# Altium PCB Telephone Circuit v1.0.PcbDoc (part 5 of 5)
Units mil, origin at the board's own origin, x right, y up, seen from the top; angles counter-clockwise.
Board outline 3149.61 x 2952.76 mil, 2 copper layers (Top Layer, Bottom Layer), stack 61.855 mil thick; 194 components, 119 nets, 557 pads, 213 vias.
Unrouted connection lines stored in the file: 77.
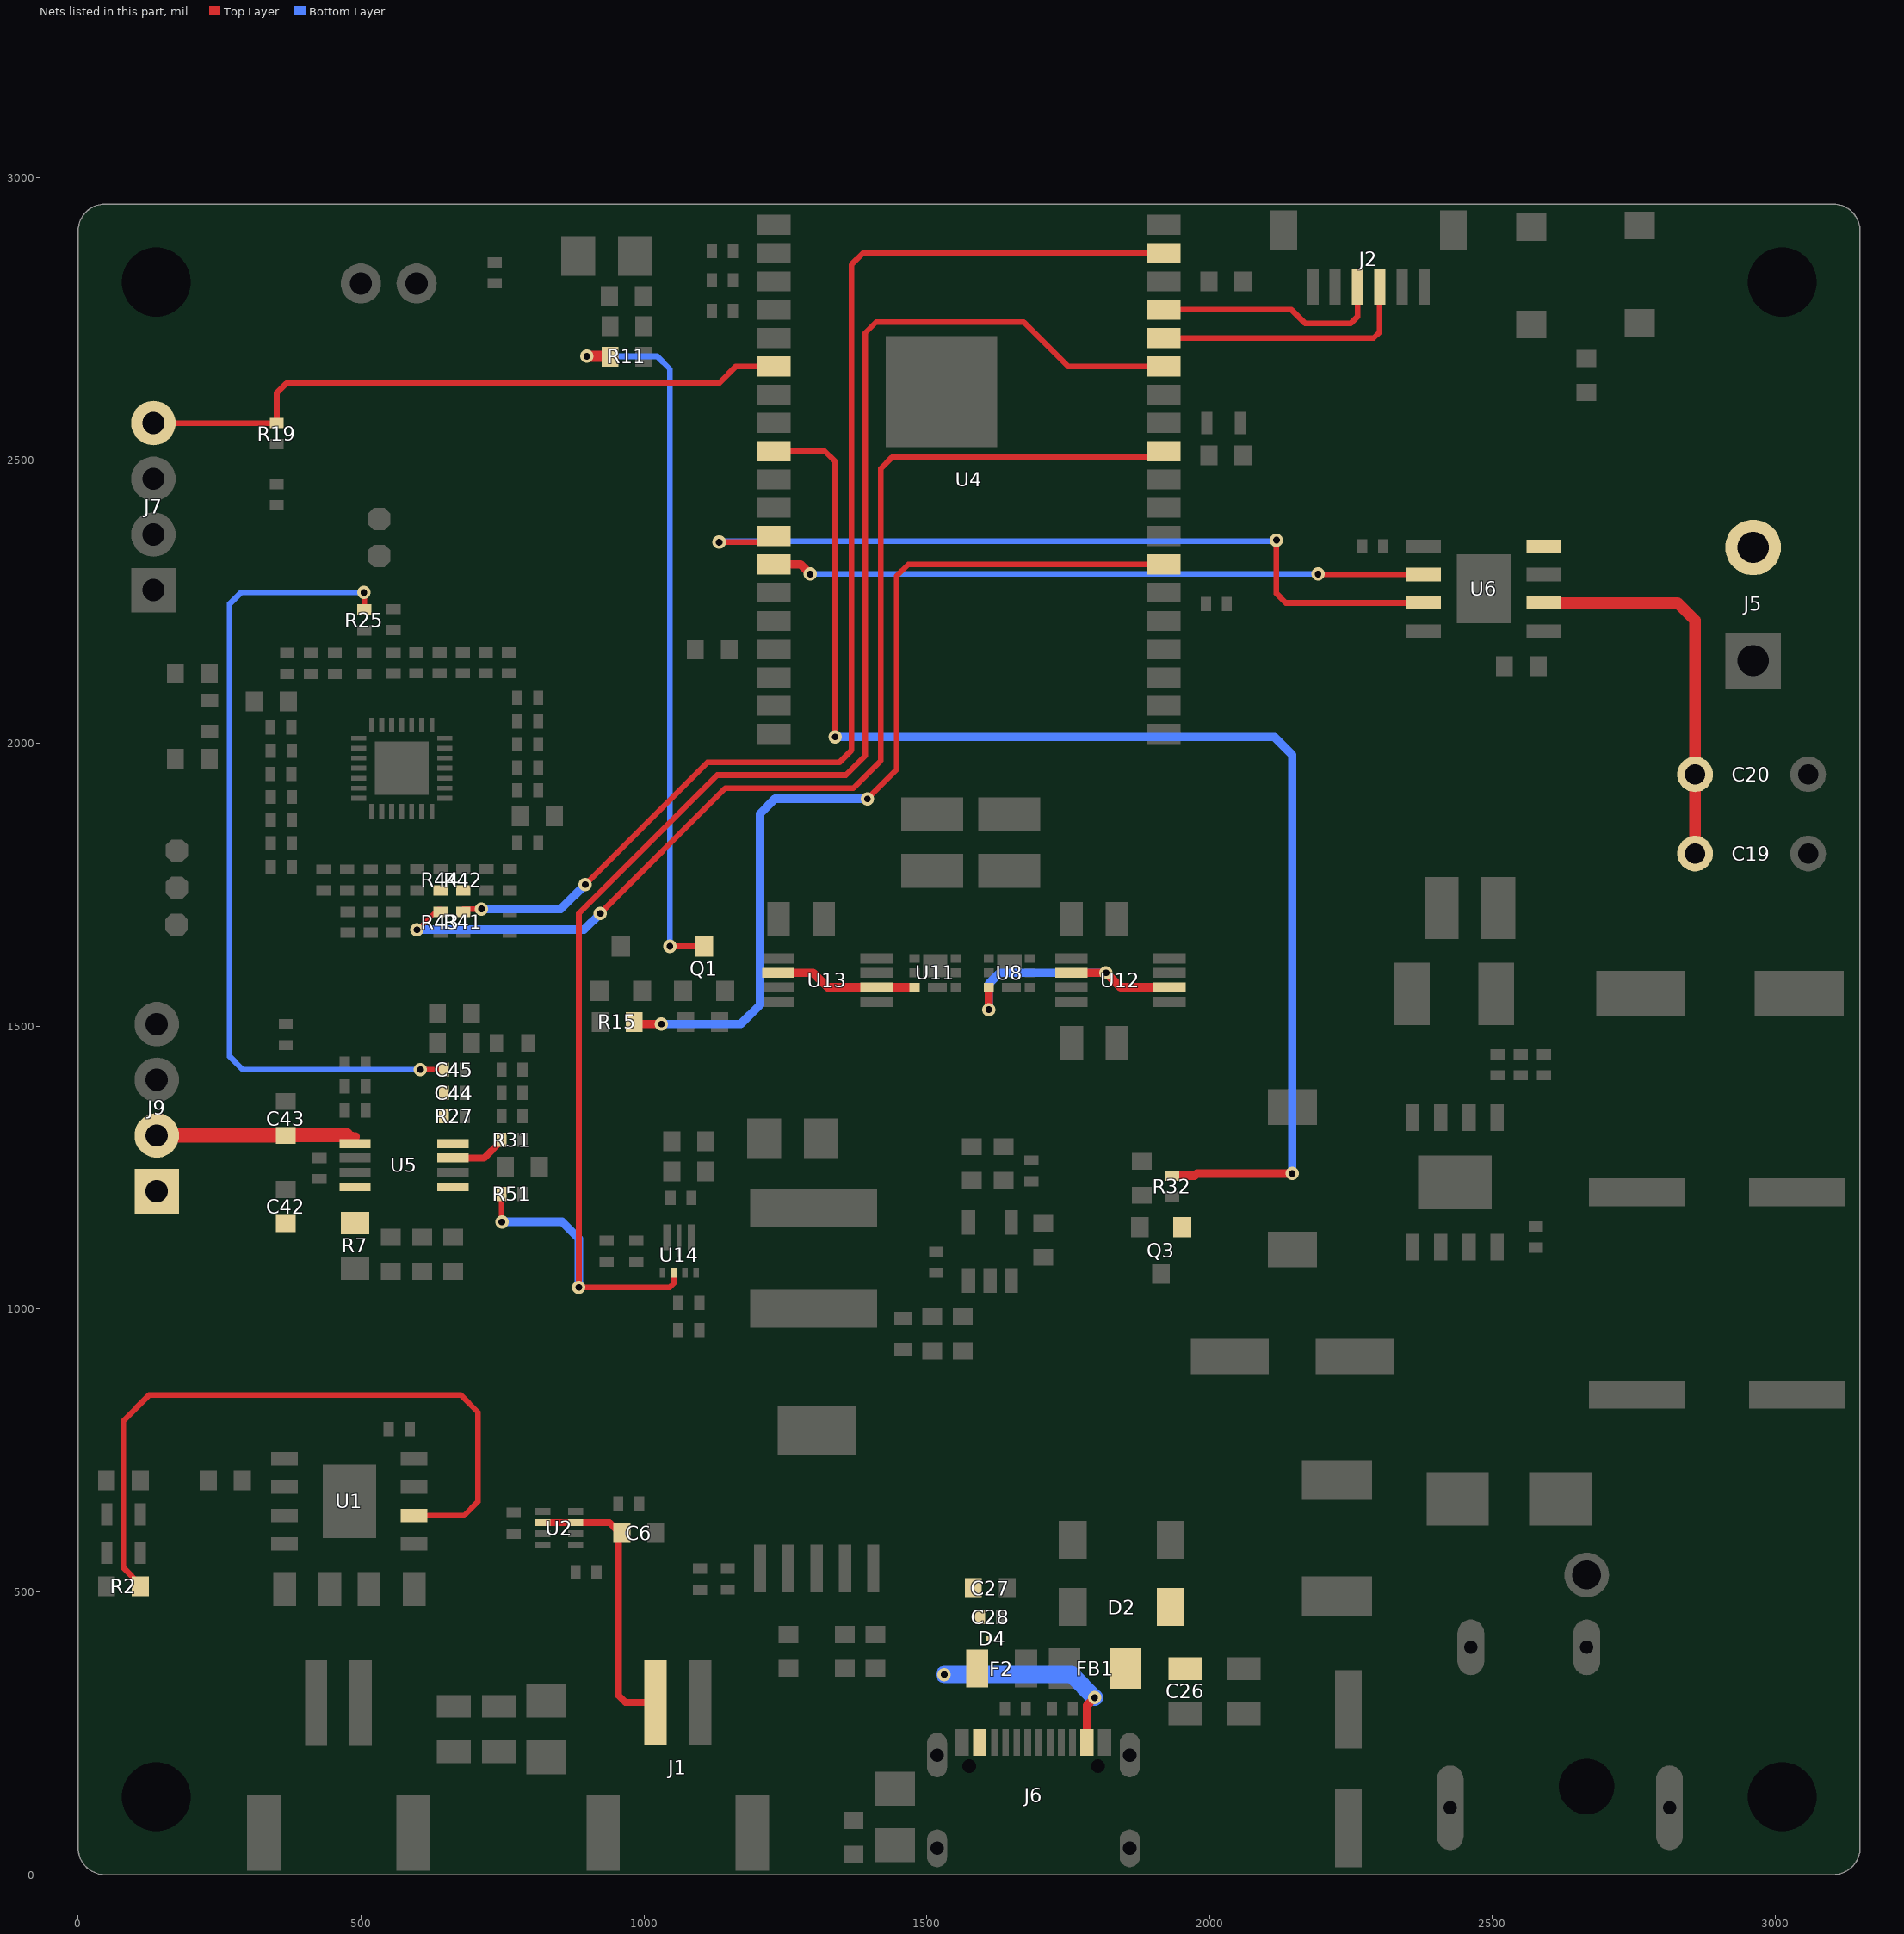
[diagram p3: the nets of this part, all layers, seen from the top]

## Via types
v1: diameter 23.62, hole 11.81, Top Layer to Bottom Layer, tented both sides, 213 vias

## Nets (pads, with @x,y where several pads share a name; then routed paths per layer and width w, separated by ;. In a path a pad name is that pad's centre, name@x,y a point inside that pad or via, vN(x,y) a via of type N, cw(c..) or ccw(c..) an arc to the next point about the centre after c; other vN are vias at no path point) (continued)
NetU8_3: U8.3 U12.2 U12.6 | length 484.1
  Top Layer w15: v1(1609.68,1528.96) U8.3@1609.68,1568.41 ; U12.2@1755.77,1594.06 v1(1816.8,1594.06) 1842.39,1568.47 U12.6@1929,1568.47
  Bottom Layer w15: v1(1609.68,1528.96) 1609.68,1574.65 1629.09,1594.06 v1(1816.8,1594.06)
NetU11_3: U11.3 U13.2 U13.6 | length 251.2
  Top Layer w15: U13.2@1237.98,1594.06 1299,1594.06 1324.59,1568.47 U13.6@1411.2,1568.47 U11.3@1478.59,1568.47
PA_CTRL_IO21: R51.2 U4.33 U5.1 U14.5 | length 3071.5
  Top Layer w10: R51.2@748.49,1203.26 748.49,1153.8 v1(749.01,1153.8) ; U14.5@1052.63,1063.71 1052.63,1045.03 1045.57,1037.98 885.18,1037.98 v1(884.96,1038.19) v1(884.96,1038.19) 885.02,1699.05 1129.61,1943.64 1356.92,1943.64 1391.34,1978.05 1391.34,2725.29 1410.35,2744.3 1671.45,2744.3 1749.61,2666.15 U4.33@1919,2666.15
  Bottom Layer w15: v1(749.01,1153.8) 855.46,1153.8 884.96,1124.29 v1(884.96,1038.19)
PA_INR+: R31.1 U5.3 | length 102.1
  Top Layer w12: U5.3@662.61,1266.8 717.8,1266.8 745.5,1294.5 748.5,1297.5 R31.1@748.5,1301
PA_INR-: R27.1 U5.4
Ringer_Coil1: C19.1 C20.1 U6.6 | length 692.5
  Top Layer w20: U6.6@2590.51,2248.19 2826.84,2248.19 2857.96,2217.07 C20.1@2857.96,1944.88 C19.1@2857.96,1804.88
Ringer_Coil2: J5.2 U6.8 | length 3
  Top Layer w15: U6.8@2590.51,2348.19 U6.8@2591.57,2347.13 ; J5.2@2959.6,2347.13 J5.2@2960.66,2346.06
Ringer_IN1: U4.12 U6.3 | length 1449.3
  Top Layer w10: v1(1133,2355.38) 1219.25,2355.38 U4.12@1230.02,2366.15 ; v1(2118,2359) 2118,2264.49 2134.47,2248.02 2377.75,2248.02 U6.3@2377.91,2248.19
  Bottom Layer w10: v1(1133,2355.38) 1134.81,2357.19 2116.19,2357.19 v1(2118,2359)
Ringer_IN2: U4.13 U6.2 | length 1155
  Top Layer w10: v1@2191.4,2298.31 2377.79,2298.31 U6.2@2377.91,2298.19
  Top Layer w15: U4.13@1230.02,2316.15 1276.85,2316.15 v1(1294,2299)
  Bottom Layer w10: v1(1294,2299) v1(2191.4,2299)
RINGER_PWR: Q3.1 R32.1 U4.9 | length 2377.8
  Top Layer w10: U4.9@1230.02,2516.15 1319.93,2516.15 1338,2498.08 v1(1338,2011)
  Top Layer w15: R32.1@1933.55,1235.32 1973.23,1235.32 1977.25,1239.34 v1(2146,1239.34)
  Bottom Layer w15: v1(1338,2011) 2114.36,2011 2146,1979.36 v1(2146,1239.34)
ROTARY: J7.4 R19.1 U4.6 | length 1169.9
  Top Layer w10: J7.4@133,2565.85 R19.1@351.01,2565.85 351.01,2619.36 367.8,2636.15 1132.69,2636.15 1162.69,2666.15 U4.6@1230.02,2666.15
ROUT2: C44.2 C45.2 R25.2 | length 1464.3
  Top Layer w10: v1(505,2266.37) 505.67,2266.37 R25.2@505.67,2236.53 ; v1(605,1423) C45.2@646.6,1422.99
  Bottom Layer w10: v1(505,2266.37) 287.95,2266.37 268,2246.42 268,1445.99 290.99,1423 v1(605,1423)
RXD0: J2.4 U4.34 | length 465.8
  Top Layer w10: U4.34@1919,2716.15 2289.77,2716.15 2300.59,2726.97 J2.4@2300.59,2806.69
SCL_IO23: R41.1 R42.1 U4.37 | length 2221.4
  Top Layer w10: R41.1@680.66,1707.02 v1(712.96,1707.02) ; v1(896.32,1750.08) 1112.04,1965.8 1345.42,1965.8 1366.72,1987.1 1366.72,2845.72 1387.15,2866.15 U4.37@1919,2866.15
  Bottom Layer w15: v1(712.96,1707.02) 853.26,1707.02 v1(896.32,1750.08)
SDA_IO18: R43.1 R44.1 U4.30 | length 2029.8
  Top Layer w8: v1(598.81,1670.32) 600.57,1670.32 637.27,1707.02 R43.1@640.77,1707.02
  Top Layer w10: v1(922.86,1698.97) 922.86,1699.59 1143.81,1920.54 1370.28,1920.54 1418.65,1968.91 1418.65,2485.5 1438.27,2505.13 1907.98,2505.13 U4.30@1919,2516.15
  Bottom Layer w15: v1@599.69,1670.32 894.21,1670.32 v1(922.86,1698.97)
Speaker+: C42.1 J9.1 R7.2 U5.8
Speaker-: C43.1 J9.2 U5.5 | length 374.5
  Top Layer w15: C43.1@366.99,1306.59 C43.1@368.05,1307.64 ; U5.5@489.39,1292.39 489.39,1294.45 476.6,1307.24 490.31,1304.99 U5.5@489.51,1300.12
  Top Layer w25: J9.2@139,1306.59 C43.1@366.99,1306.59 ; C43.1@368.05,1307.64 474.13,1307.64
STDBY: R2.2 U1.6 | length 1244.1
  Top Layer w10: R2.2@110,509.82 110,512.32 80,542.32 80,802.32 125.73,848.05 676.16,848.05 706.73,817.47 706.73,659.45 682.28,635 U1.6@594,635
TXD0: J2.3 U4.35 | length 409.8
  Top Layer w10: U4.35@1919,2766.15 2144.66,2766.15 2168.58,2742.23 2249.69,2742.23 2261.22,2753.76 J2.3@2261.22,2806.69
V_MON: Q1.3 R11.1 | length 1275.2
  Top Layer w10: R11.1@939.17,2684 R11.1@940,2683.17 ; v1@1048.95,1640.91 Q1.3@1106.31,1640.87 Q1.3@1106.31,1640.87
  Top Layer w20: v1(899,2684) R11.1@939.17,2684
  Bottom Layer w10: v1@899.19,2683.81 1023.46,2683.81 1045.95,2661.32 v1(1045.95,1640.91)
V_OR: C6.2 J1.1 U2.2 U2.7 | length 490.5
  Top Layer w12: U2.2@826.97,622.27 U2.7@877.33,622.27 ; U2.7@879.33,622.27 939.23,622.27 C6.2@955,606.5 ; C6.2@955,604 955,316.7 967.39,304.31 J1.1@1020.52,304.31
VBUS: C27.1 C28.1 D4.1 F2.1 J6.A4/B9 J6.B4/A9 | length 367.7
  Top Layer w15: J6.B4/A9@1782.97,233.62 1782.97,299.24 v1(1796.61,312.89)
  Bottom Layer w30: v1(1530.73,353.69) 1755.81,353.69 v1(1796.61,312.89)
VMON_EN: R15.1 U4.26 | length 1672.5
  Top Layer w10: v1(1394.91,1901.6) 1446.65,1953.34 1446.65,2295.56 1467.23,2316.15 U4.26@1919,2316.15
  Top Layer w15: R15.1@982.78,1507.13 986.25,1503.66 v1(1030.95,1503.66)
  Bottom Layer w15: v1(1030.95,1503.66) 1171.32,1503.66 1205.05,1537.4 1205.05,1875.05 1231.6,1901.6 v1(1394.91,1901.6)
VUSB: C26.2 D2.2 FB1.2
pads on no net: J2.MP1 J2.MP2 J4.MH J6.A6 J6.A7 J6.A8 J6.B6 J6.B7 J6.B8 J6.MH U4.14 U4.17 U4.18 U4.19 U4.20 U4.21 U4.22 U4.23 U4.24 U4.27 U4.28 U4.32 U7.6 U7.7 U9.9 U9.25 U12.3 U12.5 U13.3 U13.5

## Polygon pours and split planes (outlines as drawn)
LDO_INPUT on Bottom Layer "LDO_INPUT_L02_P036" (solid, remove dead copper, pour order 36): 1100.91,848 1110.94,858.03 1127,858.03 1312.85,858.03 1331.45,876.62 1331.45,953.99 1409.81,953.99 1409.81,819.87 1398,808.06 1110.85,808.06 1100.91,818
5V_BOOST on Bottom Layer "5V_BOOST_L02_P035" (solid, remove dead copper, pour order 35): 776.02,1482.42 783.35,1475.09 842.79,1475.09 862.54,1455.34 862.54,1354.92 873.37,1344.08 953.92,1344.08 964,1354.13 964,1453.57 964,1532 943,1553 783.78,1553 776.02,1545.24
5V on Bottom Layer "5V_L02_P034" (solid, remove dead copper, pour order 34): 676,801 689.53,787.47 689.53,488 704.94,472.6 1905.64,472.6 1917,461.23 1917,430.6 1917,398.75 1902.48,384.23 324,384.23 306.23,402 306.23,503.61 322.62,520 589,520 603.62,534.62 603.62,788 616.62,801
AGND on Bottom Layer "NONET_L01_P-001" (solid, remove dead copper, pour order 9): 853.16,1342.67 866.32,1329.5 885.02,1329.5 1760,1329.5 1778.26,1311.24 1778.26,882.26 1754.61,858.61 1424.87,858.61 1424.87,969.26 1315,969.26 1315,876.62 932.42,876.62 907.04,902 907.04,1136.12 859.16,1184 93.63,1184 93.63,2220.93 949.03,2220.93 959.35,2210.61 959.35,1756.7 853.16,1650.5
GND on Bottom Layer "NONET_L01_P-001" (solid, remove dead copper, pour order 27): 0.58,47.24 0.58,2905.51 cw(c47.82,2905.51) 47.82,2952.76 3102.94,2952.76 cw(c3102.94,2905.51) 3150.18,2905.51 3150.18,47.24 cw(c3102.94,47.24) 3102.94,0 47.82,0 cw(c47.82,47.24)
BATT on Bottom Layer "NONET_L01_P-001" (solid, pour order 6): 705,568 718.84,581.84 1776.48,581.84 1798,603.36 1798,1324.35 1778.26,1344.08 1516.91,1344.08 1505,1356 1505,1461 1516,1472 1896,1472 1917,1451 1917,502.5 1902.5,488 716,488 705,499
3.3V## on Bottom Layer "3.3V##_L02_P001" (solid, remove dead copper, pour order 1): 932.92,1652.52 945.26,1664.86 945.26,1837 859,1837 859,1900 925,1900 925,2206.5 917.5,2214 362,2214 353.28,2205.28 353.28,2105.95 306.74,2105.95 306.74,2222.44 329.29,2245 951.85,2245 972,2224.85 972,1638.15 951.63,1617.78 624.22,1617.78 619.99,1622.01 619.99,1647.47 625.03,1652.52
3V3 on Bottom Layer "3V3_L02_P025" (solid, remove dead copper, pour order 25): 89.58,2620 79.12,2609.54 79.12,971 101.12,949 759,949 775.58,932.42 775.58,716.42 793,699 1386.26,699 1386.26,636.68 723.82,636.68 707.3,653.19 707.3,736.92 707.3,802.86 689.53,820.64 33.28,820.64 10.92,843 10.92,2936 2462.58,2936 2462.58,2381 2425.58,2344 2425.58,2145.58 2415.85,2135.85 2324.67,2135.85 2314.58,2145.94 2314.58,2860 1250.58,2860 1203.69,2905.66 1073.16,2905.66 1027.5,2860 410.58,2860 410.58,2493.26 398.21,2480.9 208.57,2480.9 194.21,2495.25 194.21,2557.63 194.21,2611.79 186.01,2620
5V on Top Layer "5V_L01_P033" (solid, remove dead copper, pour order 33): 866.14,608.88 913.26,608.88 922.55,599.6 922.55,435.62 898.36,435.62 898.36,590.44 892.52,596.28 866.14,596.28
V_OR on Top Layer "V_OR_L01_P031" (solid, pour order 31): 945.61,601.15 918.63,628.13 984.28,628.13 984.28,569.03 1040.21,569.03 1040.21,229.51 945.61,229.51
NetD5_2 on Top Layer "NETD5_2_L01_P030" (solid, pour order 30): 2102.69,1621 2420.11,1621 2420.11,1314.61 2102.69,1314.61
NetD3_2 on Top Layer "NETD3_2_L01_P029" (solid, pour order 29): 2162.99,732.99 2530,732.99 2530,616.76 2162.99,616.76
VUSB on Top Layer "VUSB_L01_P017" (solid, pour order 17): 1823.12,399.94 1902.48,399.94 1902.48,506.46 1995,506.46 1995,328.29 1823.12,328.29
3.3V## on Top Layer "3.3V##_L01_P028" (solid, remove dead copper, pour order 28): 216.21,2063.83 216.73,2064.35 216.73,2140.85 466.17,2140.85 466.17,2001.13 471.74,1995.56 508.9,1995.56 508.9,1986.9 396.65,1986.9 396.65,2105.85 251.23,2105.85 251.23,2063.83
3V3# on Top Layer "3V3#_L01_P010" (solid, remove dead copper, pour order 10): 266.22,2091.01 339.01,2091.01 339.01,2050.32 315.49,2050.32 315.49,1955.43 214.73,1955.43 214.73,2032.34 266.22,2032.34
NetL2_2 on Top Layer "NONET_L01_P-001" (solid, pour order 18): 1101.01,1167 1173,1167 1173,1222 1411.99,1222 1411.99,1082.66 1057.93,1082.66 1057.93,1149.34 1067.17,1149.34 1067.17,1094.06 1101.01,1094.06
VBUS on Top Layer "VBUS_L01_P016" (solid, remove dead copper, pour order 16): 1611.42,364.12 1611.42,204 1769.28,204 1769.28,257.24 1794.78,257.24 1794.78,119 1582.18,119 1582.18,364.12
5V_BOOST on Top Layer "5V_BOOST_L01_P008" (solid, remove dead copper, pour order 8): 912.81,1104.06 964,1104.06 964,1169.23 1012,1169.23 1012,1104.06 1047.71,1104.06 1047.71,1183.87 1064.86,1183.87 1064.86,1400 912.81,1400
3V3 on Top Layer "3V3_L01_P011" (solid, remove dead copper, pour order 11): 1129.25,2805.36 1129.25,2842.21 1259.55,2842.21 1259.55,2883.87 1185.67,2883.87 1185.67,2939.04 720,2939.04 720,2840.69 826,2840.69 826,2907.44 934,2907.44 934,2817.52 1023.94,2817.52 1023.94,2805.36
5V_BOOST# on Top Layer "5V_BOOST#_L01_P026" (solid, remove dead copper, pour order 26): 491.7,1487.66 650.14,1487.66 650.14,1445.82 576,1445.82 576,1259.08 427,1259.08 427,1274.51 528.7,1274.51 528.7,1335.02 491.7,1335.02
"boost power_OR" on Top Layer "BOOST_POWER_OR_L01_P000" (solid, remove dead copper, pour order 0): 1862.41,1427 1900.46,1427 1900.46,1518.1 1968.23,1518.1 1968.23,1621 1950.12,1621 1950.12,1610.8 1900.46,1610.8 1900.46,1740.45 1701,1740.45 1701,1586.19 1454.69,1586.19 1454.56,1804.45 1454.69,1804.45 2036,1804.45 2036,1260.83 1910.42,1260.83 1910.42,1226.32 1862.41,1226.32
LDO_INPUT on Top Layer "NONET_L01_P-001" (solid, pour order 14): 1221.16,709.84 1273.84,709.84 1273.84,393.71 1231.64,393.71 1231.64,599.25 1127,599.25 1127,857 1221.16,857
3V3 on Top Layer "NONET_L01_P-001" (solid, pour order 15): 1334.89,409.62 1334.89,669 1375.44,669 1375.44,409.62
"Coil power_42V" on Top Layer "COIL_POWER_42V_L01_P020" (solid, remove dead copper, pour order 20): 2475.31,1494 2475.31,1763.64 2560,1763.64 2560,2210 2757,2210 2757,1721.39 2845.07,1721.39 2845.07,824.09 2650,824.09 2650,1494
Ringer_Coil2 on Top Layer "RINGER_COIL2_L01_P021" (solid, remove dead copper, pour order 21): 2641,2292.5 2641,2325.41 2560,2325.41 2560,2409.73 3019.83,2409.73 3019.83,2292.5
Ringer_Coil1 on Top Layer "RINGER_COIL1_L01_P022" (solid, remove dead copper, pour order 22): 2933.4,2077 2891,2077 2891,2273.19 2560,2273.19 2560,2225.92 2778,2225.92 2778,1743.88 2933.4,1743.88
NetC19_2 on Top Layer "NETC19_2_L01_P023" (solid, remove dead copper, pour order 23): 2911.45,2096.85 2911.45,2273.19 3123,2273.19 3123,1743.88 2954.02,1743.88 2954.02,2096.85
BOOST_VIN on Top Layer "BOOST_VIN_L01_P012" (solid, remove dead copper, pour order 12): 1860.85,1106.44 2002.3,1106.44 2002.3,1136.51 2381,1136.51 2381,1069 2484.95,1069 2484.95,1136.51 2530,1136.51 2530,884.5 2162.99,884.5 2162.99,969 1860.85,969
DC_Barrel_5V on Top Layer "DC_BARREL_5V_L01_P013" (solid, remove dead copper, pour order 13): 1906.39,527.09 1906.39,732.99 2143,732.99 2143,599 2377.92,599 2377.92,213 2116,213 2116,328.29 2014,328.29 2014,527.09
NetC29_2 on Top Layer "NETC29_2_L01_P024" (solid, pour order 24): 1334.29,66.05 1408.95,66.05 1408.95,93 1491,93 1491,257.24 1540.14,257.24 1540.14,96.05 1838.04,96.05 1838.04,257.24 1889,257.24 1889,9.78 1334.29,9.78
5V on Top Layer "5V_L01_P002" (solid, remove dead copper, pour order 2): 1784.31,1427 1838.04,1427 1838.04,415.52 1695.16,415.52 1695.16,734 1782,734 1782,1325 1633.05,1325 1633.05,1576.35 1691.28,1576.35 1691.28,1551.74 1784.31,1551.74
GND on Top Layer "NONET_L01_P-001" (solid, remove dead copper, pour order 19): 0,47.24 0,2905.51 cw(c47.24,2905.51) 47.24,2952.76 3102.36,2952.76 cw(c3102.36,2905.51) 3149.61,2905.51 3149.61,47.24 cw(c3102.36,47.24) 3102.36,0 47.24,0 cw(c47.24,47.24)

## Other copper
Top Layer:
  rectangle net GND: 903.34,2758 975,2807.65
  rectangle net GND: 791.8,415.33 888.35,589.2
  rectangle net 5V: 898.36,422.79 925.35,566.6
  rectangle net 5V: 866.14,596.28 922.55,608.88
  rectangle net 5V: 866.14,596.28 904.42,608.88
  rectangle net V_OR: 866.14,615.97 984.28,628.57
  rectangle net 5V: 1682.32,1534.02 1784.31,1551.84
  rectangle net 5V: 1633.05,1549.73 1691.28,1576.35
  rectangle net BATT: 1501.96,1483 1577.78,1576.35
  rectangle net BATT: 1432,1344.08 1577.78,1463
  rectangle net NetF2_2: 1655.92,328.29 1771.16,401
  rectangle net 3V3: 1122.81,2838.43 1191.87,2847.65
  rectangle net GND: 1272.47,1266.41 1370,1400
  rectangle net AGND: 1074.91,1266.41 1242.67,1400
  rectangle net AGND: 912.81,913 1069.8,1023.02
  rectangle net AGND: 1074.91,1183.87 1160,1381
  rectangle net GND: 841.29,2874.07 918.71,2896.43
  rectangle net AGND: 1562.35,1253.46 1762.39,1315
  rectangle net 3.3V##: 444.19,2056.01 466.17,2140.85
  rectangle net 3.3V##: 396.65,1986.9 508.9,1995.56
  rectangle net 3.3V##: 216.21,2063.83 250.73,2140.85
  rectangle net 3.3V##: 216.73,2105.85 466.17,2140.85
  rectangle net AGND: 356.78,2150.52 466.17,2209.03
  rectangle net LDO_INPUT: 1087.08,913 1137.01,1072.57
  region net LDO_INPUT: 1087.08,1050 1087.08,913 1411.99,913 1411.99,1050
  rectangle net VBUS: 1513.23,305.62 1611.42,531.11
  region net AGND: 420.83,2191.2 401.58,2191.2 401.58,2159.52 420.83,2159.52
  region net AGND: 463.22,2190.69 443.97,2190.69 443.97,2159.02 463.22,2159.02
  region net AGND: 730.21,2184.41 710.97,2184.41 710.97,2160.53 730.21,2160.53
  region net AGND: 648.21,2184.41 628.97,2184.41 628.97,2160.53 648.21,2160.53
  region net AGND: 607.65,2184.41 588.41,2184.41 588.41,2160.53 607.65,2160.53
  rectangle net NetL2_2: 1054.97,1080.19 1411.99,1096.69
  rectangle net NetL2_2: 1054.97,1082.66 1069.99,1150.18
  rectangle net 5V_BOOST: 1023,1104.06 1047.71,1313.5
  rectangle net 3V3: 338.51,2449.08 363.51,2537.85
  rectangle net NetLED3_2: 2043.69,2491.26 2073.69,2585.83
  region net AGND: 349.49,1480 349.49,1336.05 480.03,1336.05 480.03,1480
  rectangle net BATT: 1209.43,1472 1266.52,1544.61
  region net NetC32_2: 515.22,2203.53 495.97,2203.53 495.97,2159.52 515.22,2159.52
  rectangle net 5V_BOOST: 776.14,1445.68 821.53,1539.66
  region net PA_CTRL_IO21: 757.49,1221.35 635.06,1221.35 635.06,1190.76 757.49,1190.76
  rectangle net NetC73_1: 368.51,1969.78 386.51,1999.4
  rectangle net NetC15_2: 665.14,1445.68 765.84,1539.66
  rectangle net Speaker-: 462.07,1291.79 516.94,1320.18
  rectangle net NetC17_2: 590.5,1111.7 680.11,1141.7
  rectangle net NetC16_2: 464.39,1051.7 625.5,1091.7
  rectangle net NetD3_1: 2556.61,471 2816.57,732.99
  rectangle net GND: 2870,824.09 3122.66,1721.39
  rectangle net 5V: 306.99,424 388.61,596.81
  rectangle net NetR1_1: 275,677.17 388.61,693.84
  rectangle net GND: 425.38,475 534,534.89
  rectangle net 5V: 570.38,723.19 661.62,800.5
  rectangle net BATT: 570.38,471 618,596.81
  region net PA_INR-: 655.61,1353.51 635.06,1353.51 635.06,1293 655.61,1293
  region net ROUT2: 655.62,1435.48 637.62,1435.48 637.62,1369.49 655.62,1369.49
  region net NetC44_1: 692.61,1394.49 674.61,1394.49 674.61,1328.51 692.61,1328.51
  region net NetC46_2: 757.5,1435.5 739.5,1435.5 739.5,1328.5 757.5,1328.5
  region net NetC47_1: 794.5,1354.49 776.5,1354.49 776.5,1288.5 794.5,1288.5
  rectangle net AGND: 349.49,1196.1 439.5,1247.1
  rectangle net AGND: 349.49,1351.59 385,1475.43
  rectangle net Speaker+: 462,1131.7 517.25,1216.69
  rectangle net AGND: 349.49,1234.98 516.94,1247.1
  region net 5V: 1784.32,1548.02 1727,1548.02 1727,1440 1784.32,1440
  rectangle net "boost power_OR": 1382.66,1616.56 1575.91,1655.27
  region net NetC66_1: 1784.32,1723.24 1727.13,1723.24 1727.13,1620.71 1784.32,1620.71
  region net NetC68_1: 1266.52,1723.24 1209.33,1723.24 1209.33,1619.65 1266.52,1619.65
  rectangle net BATT: 1118.71,1435.87 1577.78,1522.21
  region net NetQ1_1: 1052.76,1580.24 1052.76,1489.63 1088.71,1489.63 1088.71,1580.24
  region net BATT: 1118.71,1580.24 1118.71,1489.63 1186,1489.63 1186,1580.24
  rectangle net LDO_INPUT: 1388,913 1473.75,940.12
  rectangle net AGND: 1492.06,910.87 1723.06,955.87
  rectangle net AGND: 1599.75,966 1623.37,1071.91
  rectangle net NetC34_2: 1442.25,970.87 1585.97,1076.56
  rectangle net 3V3#: 1562.35,1211.46 1762.39,1241.96
  rectangle net 3V3#: 1562.35,1130.97 1592.5,1241.95
  rectangle net NetQ3_2: 1862.41,1174.58 1946.05,1215.83
  rectangle net RINGER_PWR: 1957.85,1126.96 1988.61,1250
  rectangle net RINGER_PWR: 1921.05,1226.32 1978,1250
  rectangle net 5V: 97,549.13 128.68,656.5
  rectangle net 3V3: 720,2840.69 752,2939.04
  rectangle net BATT: 753.88,531 782.38,611.58
  rectangle net BATT: 570.38,506 782.38,556.81
  rectangle net 5V: 1695.16,427.42 1782.38,489.6
  rectangle net Speaker+: 99.63,1131 246,1247.52
  rectangle net Speaker+: 154,1131 477,1171.7
  rectangle net 3.3V##: 627.98,1615.01 776.14,1674.02
  rectangle net NetC72_2: 634.92,1919.68 661.1,1937.71
  region net NetQ3_2: 1860.85,1215.83 1860.85,1126.96 1916.5,1126.96 1916.5,1215.83
  rectangle net GND: 633.86,140.93 862,237.4
  rectangle net GND: 400.94,229.35 448.98,535
  region net NetLED1_2: 65,714.32 35,714.32 35,616.82 65,616.82
  rectangle net NetLED2_2: 34.68,492.32 65,588.5
  rectangle net AGND: 1681.56,964.49 1723.06,1106.44
  rectangle net AGND: 1599.75,910.87 1723.06,1002.99
  rectangle net NetC34_2: 1512.06,1034.51 1537.06,1071.44
  rectangle net NetR54_1: 979.71,1054.85 1032.94,1072.57
  rectangle net NetR54_1: 912.81,1054.85 1003.21,1092.34
  rectangle net DT2: 1146,2148.65 1259.55,2183.87
  rectangle net 3.3V##: 628.27,1656.02 693.16,1674.02
  rectangle net NetC35_2: 504.68,1656.02 570.17,1674.02
  rectangle net NetC36_1: 475.85,1693.02 533.18,1711.02
  rectangle net NetC36_1: 504.68,1698.02 529.69,1748.58
  rectangle net ES8388_SDA: 587.12,1768.04 653.27,1786.01
  rectangle net SDA_IO18: 628.27,1698.02 653.27,1749.01
  rectangle net SCL_IO23: 668.16,1698.02 693.16,1749.03
  rectangle net AGND: 709.31,1731.01 775.42,1749.05
  rectangle net ES8388_SCL: 670.63,1768.05 734.31,1784.4
  rectangle net LDO_INPUT: 1074,229.51 1126,469.97
  rectangle net LDO_INPUT: 1241,393.71 1266.19,583.42
  rectangle net LDO_INPUT: 1074,393.72 1160.71,513.1
  rectangle net LDO_INPUT: 1074,393.71 1273.84,469.97
  rectangle net 5V: 1695.16,439.54 1782.38,734
  rectangle net BATT: 570.38,266 629.86,556.81
  rectangle net BATT: 479.68,266 862,378.96
  region net ES8388_VREF: 651.16,2132.53 585.6,2132.53 585.6,2114.53 651.16,2114.53
  region net NetC31_2: 567.21,2204.03 547.97,2204.03 547.97,2160.02 567.21,2160.02
  region net A_LRCLK: 774.66,2132.53 708.16,2132.53 708.16,2113.36 774.66,2113.36
  region net A_CLK: 785.14,2051.04 767.16,2051.04 767.16,1985.38 785.14,1985.38
  pour cut-out: 1808.8,1534.02 1863.08,1534.02 1863.08,1432.73 1808.8,1432.73
  pour cut-out: 689.27,1016.79 635,1016.79 635,1092.52 689.27,1092.52
  pour cut-out: 579.33,1101.91 525.05,1101.91 525.05,1176.61 579.33,1176.61
  pour cut-out: 1262.67,1255.31 1262.67,1408.04 1380,1408.04 1380,1255.31
  pour cut-out: 959.35,1534.86 959.35,1589.13 1047.41,1589.13 1047.41,1534.86
  pour cut-out: 1434,1812.78 1434,1942.52 1454.69,1942.52 1454.69,1812.78
Multi-Layer:
  pour cut-out: 2885.83,137.8 ccw(c3011.81,137.8) 3011.81,11.81 ccw(c3011.81,137.8) 3137.8,137.8 ccw(c3011.81,137.8) 3011.81,263.78 ccw(c3011.81,137.8)
  pour cut-out: 11.81,137.8 ccw(c137.8,137.8) 137.8,11.81 ccw(c137.8,137.8) 263.78,137.8 ccw(c137.8,137.8) 137.8,263.78 ccw(c137.8,137.8)
  pour cut-out: 11.81,2814.96 ccw(c137.8,2814.96) 137.8,2688.98 ccw(c137.8,2814.96) 263.78,2814.96 ccw(c137.8,2814.96) 137.8,2940.94 ccw(c137.8,2814.96)
  pour cut-out: 2885.83,2814.96 ccw(c3011.81,2814.96) 3011.81,2688.98 ccw(c3011.81,2814.96) 3137.8,2814.96 ccw(c3011.81,2814.96) 3011.81,2940.94 ccw(c3011.81,2814.96)

## Silkscreen, mask and mechanical layers (free items; w line width, h text height)
Top Overlay:
  lines w5: 851.79,504.53 866.85,518.7 ; 934.03,2648 935.77,2648 ; 1116.11,2729.91 1118.5,2729.91 1119.07,2729.91
  lines w7.5: 731.03,957.42 731.03,826.03 858.84,826.03 ; 850,2915.46 1032,2915.46 1032,2648 871.04,2648 ; 869,2374 1000.51,2374 1000.51,2621.56 871.04,2621.56 ; 898.68,1133.84 898.68,1053.52 1003,1053.52 ; 935.77,2621.56 935.77,2648 ; 1116.11,2621.56 1116.11,2729.91 ; 1169.75,2425 1031.95,2425 1031.95,2470.78 1031.95,2621.56 1169.75,2621.56 ; 1171,2729.91 1066,2729.91 1066,2748 1066,2898.78 1171,2898.78 ; 1545,409.12 1545,542.97 1679.12,542.97 1679.12,409.12 ; 1696.68,715 1696.68,901.99 1846,901.99 1846,715 ; 2103,1500 2103,1632 2302,1632 2302,1496.66 ; 2478.92,1399.65 2478.92,1477.22 2621.63,1477.22 2621.63,1401.59
  text "VOLTLINK" at 2117.59,2704.62 h75
  text "HSET DET" at 391.42,2647.36 h75
  text "RESET" at 2585.3,2498.57 h75 r90
  text "BOOT" at 2790.02,2485.5 h75 r90
  text "LOUT2" at 571.36,2369.48 h60
  text "LOUT1" at 571.36,2304.24 h60
  text "ROTARY DIALER" at 312.91,2166.76 h75 r90
  text "RINGER COIL" at 2742.93,2044.26 h75 r90
  text "RIN2" at 21.07,1793.54 h60
  text "LIN2" at 11.36,1718.29 h60
  text "RIN1" at 11.07,1653.31 h60
  text "1" at 2070.34,1503.68 h60
  text "1" at 2443.88,1444 h60
  text "HEADSET" at 324.57,1107.53 h75 r90
  text "2" at 854.15,1056.54 h60
  text "3" at 1701.6,917.58 h60
  text "2" at 689.6,827.5 h60
  text "CHRG" at 133.54,611.52 h60
  text "3" at 1547.6,560 h60
  text "STDBY" at 133.54,543.52 h60
  text "FUSE" at 2142.23,502.32 h75 r90
  text "INPUT" at 2416.41,468 h75
  text "5V" at 2724.28,468 h75
  text "BATTERY" at 324.5,391.99 h75
  text "SWITCH" at 904.39,390.74 h75
  text "+" at 557.34,378.57 h75 r270
  text "_" at 404.86,378.49 h60 r180
Bottom Overlay:
  text "Ver-v2.0" at 2779.51,793.28 h60 r270
  text "TELEPHONE CIRCUIT" at 2886.11,547.49 h60 r270
Board Outline:
  the board outline again, w10
Fabrication:
  drawing of 191 lines, arcs and shapes, not listed
  text "Layer" at 3694.09,2867.99 h60
  text "Name" at 4104,2867.99 h60
  text "Material" at 5033.74,2867.99 h60
  text "Thickness" at 5893.51,2867.99 h60
  text "Constant" at 6543.35,2867.99 h60
  text "Board Layer Stack" at 7113.21,2867.99 h60
  text "Top Overlay" at 4104,2747.99 h60
  text "Top Solder" at 4104,2627.99 h60
  text "Solder Resist" at 5033.74,2627.99 h60
  text "0.010mm" at 5893.51,2627.99 h60
  text "3.5" at 6543.35,2627.99 h60
  text "1" at 3694.09,2507.99 h60
  text "Top Layer" at 4104,2507.99 h60
  text "0.036mm" at 5893.51,2507.99 h60
  text "Dielectric 1" at 4104,2387.99 h60
  text "FR-4" at 5033.74,2387.99 h60
  text "1.500mm" at 5893.51,2387.99 h60
  text "4.8" at 6543.35,2387.99 h60
  text "2" at 3694.09,2267.99 h60
  text "Bottom Layer" at 4104,2267.99 h60
  text "0.036mm" at 5893.51,2267.99 h60
  text "Bottom Solder" at 4104,2147.99 h60
  text "Solder Resist" at 5033.74,2147.99 h60
  text "0.010mm" at 5893.51,2147.99 h60
  text "3.5" at 6543.35,2147.99 h60
  text "Bottom Overlay" at 4104,2027.99 h60
  text "Total board thickness:" at 3694.09,1907.99 h60
  text "1.591mm" at 5893.51,1907.99 h60
Drill Drawing:
  circle w10: c57.62,4626.27 r20
  circle w10: c57.62,4626.27 r33.33
  circle w10: c57.62,4176.27 r33.33
  lines w10: 24.29,4009.61 40.96,4009.61 57.62,3992.94 74.29,4009.61 90.96,4009.61 74.29,4026.27 90.96,4042.94 74.29,4042.94 57.62,4059.61 40.96,4042.94 24.29,4042.94 40.96,4026.27 24.29,4009.61 ; 24.29,4309.61 40.96,4309.61 40.96,4292.94 74.29,4292.94 74.29,4309.61 90.96,4309.61 90.96,4342.94 74.29,4342.94 74.29,4359.61 40.96,4359.61 40.96,4342.94 24.29,4342.94 24.29,4309.61 ; 24.29,4459.61 40.96,4459.61 57.62,4442.94 74.29,4459.61 90.96,4459.61 74.29,4476.27 90.96,4492.94 74.29,4492.94 57.62,4509.61 40.96,4492.94 24.29,4492.94 40.96,4476.27 24.29,4459.61 ; 24.29,4742.94 90.96,4742.94 90.96,4809.61 24.29,4809.61 24.29,4742.94 ; 24.29,4892.94 90.96,4892.94 90.96,4959.61 24.29,4959.61 24.29,4892.94 ; 24.29,5109.61 90.96,5109.61 57.62,5042.94 24.29,5109.61 ; 24.29,5192.94 57.62,5209.61 90.96,5192.94 74.29,5226.27 90.96,5259.61 57.62,5242.94 24.29,5259.61 40.96,5226.27 24.29,5192.94 ; 24.29,5376.27 57.62,5342.94 90.96,5376.27 57.62,5409.61 24.29,5376.27 ; 24.29,5492.94 24.29,5509.61 40.96,5526.27 24.29,5542.94 24.29,5559.61 40.96,5559.61 57.62,5542.94 74.29,5559.61 90.96,5559.61 90.96,5542.94 74.29,5526.27 90.96,5509.61 90.96,5492.94 74.29,5492.94 57.62,5509.61 40.96,5492.94 24.29,5492.94 ; 24.29,5709.61 90.96,5709.61 57.62,5642.94 24.29,5709.61 ; 37.62,4016.27 47.62,4016.27 57.62,4006.27 67.62,4016.27 77.62,4016.27 67.62,4026.27 77.62,4036.27 67.62,4036.27 57.62,4046.27 47.62,4036.27 37.62,4036.27 47.62,4026.27 37.62,4016.27 ; 37.62,4906.27 77.62,4906.27 77.62,4946.27 37.62,4946.27 37.62,4906.27 ; 37.62,5696.27 77.62,5696.27 57.62,5656.27 37.62,5696.27
  lines w15: -35.5,3947.94 7814.33,3947.94 ; -35.5,5747.94 7814.33,5747.94 ; 515.38,3797.94 515.38,5897.94 ; 1115.22,3797.94 1115.22,5897.94 ; 2254.88,3797.94 2254.88,5897.94 ; 2760.76,3797.94 2760.76,5897.94 ; 3494.56,3797.94 3494.56,5897.94 ; 4994.11,3797.94 4994.11,5897.94 ; 5583.96,3797.94 5583.96,5897.94 ; 6329.76,3797.94 6329.76,5897.94 ; -35.5,3797.94 7814.33,3797.94 7814.33,5897.94 -35.5,5897.94 -35.5,3797.94
  text "Symbol" at 54.5,5792.94 h72
  text "Count" at 560.38,5792.94 h72
  text "Hole Size" at 1160.22,5792.94 h72
  text "Plated" at 2299.88,5792.94 h72
  text "Hole Type" at 2805.76,5792.94 h72
  text "Drill Layer Pair" at 3539.56,5792.94 h72
  text "Via/Pad" at 5039.11,5792.94 h72
  text "Pad Shape" at 5628.96,5792.94 h72
  text "Template" at 6374.76,5792.94 h72
  text "213" at 560.38,5642.94 h60
  text "0.300mm (11.81mil)" at 1160.22,5642.94 h60
  text "PTH" at 2299.88,5642.94 h60
  text "Round" at 2805.76,5642.94 h60
  text "Top Layer - Bottom Layer" at 3539.56,5642.94 h60
  text "Via" at 5039.11,5642.94 h60
  text "Rounded" at 5628.96,5642.94 h60
  text "v60h30m0mx0" at 6374.76,5642.94 h60
  text "2" at 560.38,5492.94 h60
  text "0.600mm (23.62mil)" at 1160.22,5492.94 h60
  text "PTH" at 2299.88,5492.94 h60
  text "Slot" at 2805.76,5492.94 h60
  text "Top Layer - Bottom Layer" at 3539.56,5492.94 h60
  text "Pad" at 5039.11,5492.94 h60
  text "Rounded" at 5628.96,5492.94 h60
  text "r90_170h60_140r45" at 6374.76,5492.94 h60
  text "2" at 560.38,5342.94 h60
  text "0.600mm (23.62mil)" at 1160.22,5342.94 h60
  text "PTH" at 2299.88,5342.94 h60
  text "Slot" at 2805.76,5342.94 h60
  text "Top Layer - Bottom Layer" at 3539.56,5342.94 h60
  text "Pad" at 5039.11,5342.94 h60
  text "Rounded" at 5628.96,5342.94 h60
  text "(Mixed)" at 6374.76,5342.94 h60
  text "2" at 560.38,5192.94 h60
  text "0.600mm (23.62mil)" at 1160.22,5192.94 h60
  text "PTH" at 2299.88,5192.94 h60
  text "Slot" at 2805.76,5192.94 h60
  text "Top Layer - Bottom Layer" at 3539.56,5192.94 h60
  text "Pad" at 5039.11,5192.94 h60
  text "Rounded" at 5628.96,5192.94 h60
  text "(Mixed)" at 6374.76,5192.94 h60
  text "2" at 560.38,5042.94 h60
  text "0.600mm (23.62mil)" at 1160.22,5042.94 h60
  text "PTH" at 2299.88,5042.94 h60
  text "Slot" at 2805.76,5042.94 h60
  text "Top Layer - Bottom Layer" at 3539.56,5042.94 h60
  text "Pad" at 5039.11,5042.94 h60
  text "Rounded" at 5628.96,5042.94 h60
  text "(Mixed)" at 6374.76,5042.94 h60
  text "2" at 560.38,4892.94 h60
  text "0.620mm (24.41mil)" at 1160.22,4892.94 h60
  text "NPTH" at 2299.88,4892.94 h60
  text "Round" at 2805.76,4892.94 h60
  text "Top Layer - Bottom Layer" at 3539.56,4892.94 h60
  text "Pad" at 5039.11,4892.94 h60
  text "Rounded" at 5628.96,4892.94 h60
  text "c0hn62" at 6374.76,4892.94 h60
  text "4" at 560.38,4742.94 h60
  text "0.900mm (35.43mil)" at 1160.22,4742.94 h60
  text "PTH" at 2299.88,4742.94 h60
  text "Round" at 2805.76,4742.94 h60
  text "Top Layer - Bottom Layer" at 3539.56,4742.94 h60
  text "Pad" at 5039.11,4742.94 h60
  text "Rounded" at 5628.96,4742.94 h60
  text "c160h90m170mx170p0" at 6374.76,4742.94 h60
  text "10" at 560.38,4592.94 h60
  text "1.000mm (39.37mil)" at 1160.22,4592.94 h60
  text "PTH" at 2299.88,4592.94 h60
  text "Round" at 2805.76,4592.94 h60
  text "Top Layer - Bottom Layer" at 3539.56,4592.94 h60
  text "Pad" at 5039.11,4592.94 h60
  text "(Mixed)" at 5628.96,4592.94 h60
  text "(Mixed)" at 6374.76,4592.94 h60
  text "1" at 560.38,4442.94 h60
  text "1.300mm (51.18mil)" at 1160.22,4442.94 h60
  text "PTH" at 2299.88,4442.94 h60
  text "Round" at 2805.76,4442.94 h60
  text "Top Layer - Bottom Layer" at 3539.56,4442.94 h60
  text "Pad" at 5039.11,4442.94 h60
  text "Rounded" at 5628.96,4442.94 h60
  text "c200h130o0_0m210mx210p0" at 6374.76,4442.94 h60
  text "2" at 560.38,4292.94 h60
  text "1.400mm (55.12mil)" at 1160.22,4292.94 h60
  text "PTH" at 2299.88,4292.94 h60
  text "Round" at 2805.76,4292.94 h60
  text "Top Layer - Bottom Layer" at 3539.56,4292.94 h60
  text "Pad" at 5039.11,4292.94 h60
  text "(Mixed)" at 5628.96,4292.94 h60
  text "(Mixed)" at 6374.76,4292.94 h60
  text "1" at 560.38,4142.94 h60
  text "2.500mm (98.43mil)" at 1160.22,4142.94 h60
  text "NPTH" at 2299.88,4142.94 h60
  text "Round" at 2805.76,4142.94 h60
  text "Top Layer - Bottom Layer" at 3539.56,4142.94 h60
  text "Pad" at 5039.11,4142.94 h60
  text "Rounded" at 5628.96,4142.94 h60
  text "c0hn250o0_0m10mx10p0" at 6374.76,4142.94 h60
  text "4" at 560.38,3992.94 h60
  text "3.100mm (122.05mil)" at 1160.22,3992.94 h60
  text "NPTH" at 2299.88,3992.94 h60
  text "Round" at 2805.76,3992.94 h60
  text "Top Layer - Bottom Layer" at 3539.56,3992.94 h60
  text "Pad" at 5039.11,3992.94 h60
  text "Rounded" at 5628.96,3992.94 h60
  text "c0hn310" at 6374.76,3992.94 h60
  text "245 Total" at 560.38,3842.94 h60
  text "Slot definitions :" at 54.5,3697.97 h60
  text "Routed Path Length" at 1087.19,3697.97 h60
  text "= Calculated from tool start centre position to tool end centre position." at 2189.86,3697.97 h60
  text "Hole Length" at 1087.19,3597.99 h60
  text "= Routed Path Length + Tool Size = Slot length as defined in the PCB layout" at 1779.99,3597.99 h60

## Dimensions
3149.61,47.24 to 0,47.24 on Dimensions
3102.36,2952.76 to 3102.36,0 on Dimensions